# Altium PCB Baseboard-Development.PcbDoc (part 8 of 8)
Units mm, origin at the board's own origin, x right, y up, seen from the top; angles counter-clockwise.
Board outline 120 x 90 mm, 6 copper layers (Top Layer, SIGNAL-1, PWR, SIGNAL-2, GND-2, Bottom Layer), stack 1.705 mm thick; 417 components, 313 nets, 1500 pads, 606 vias.
Unrouted connection lines stored in the file: 357.
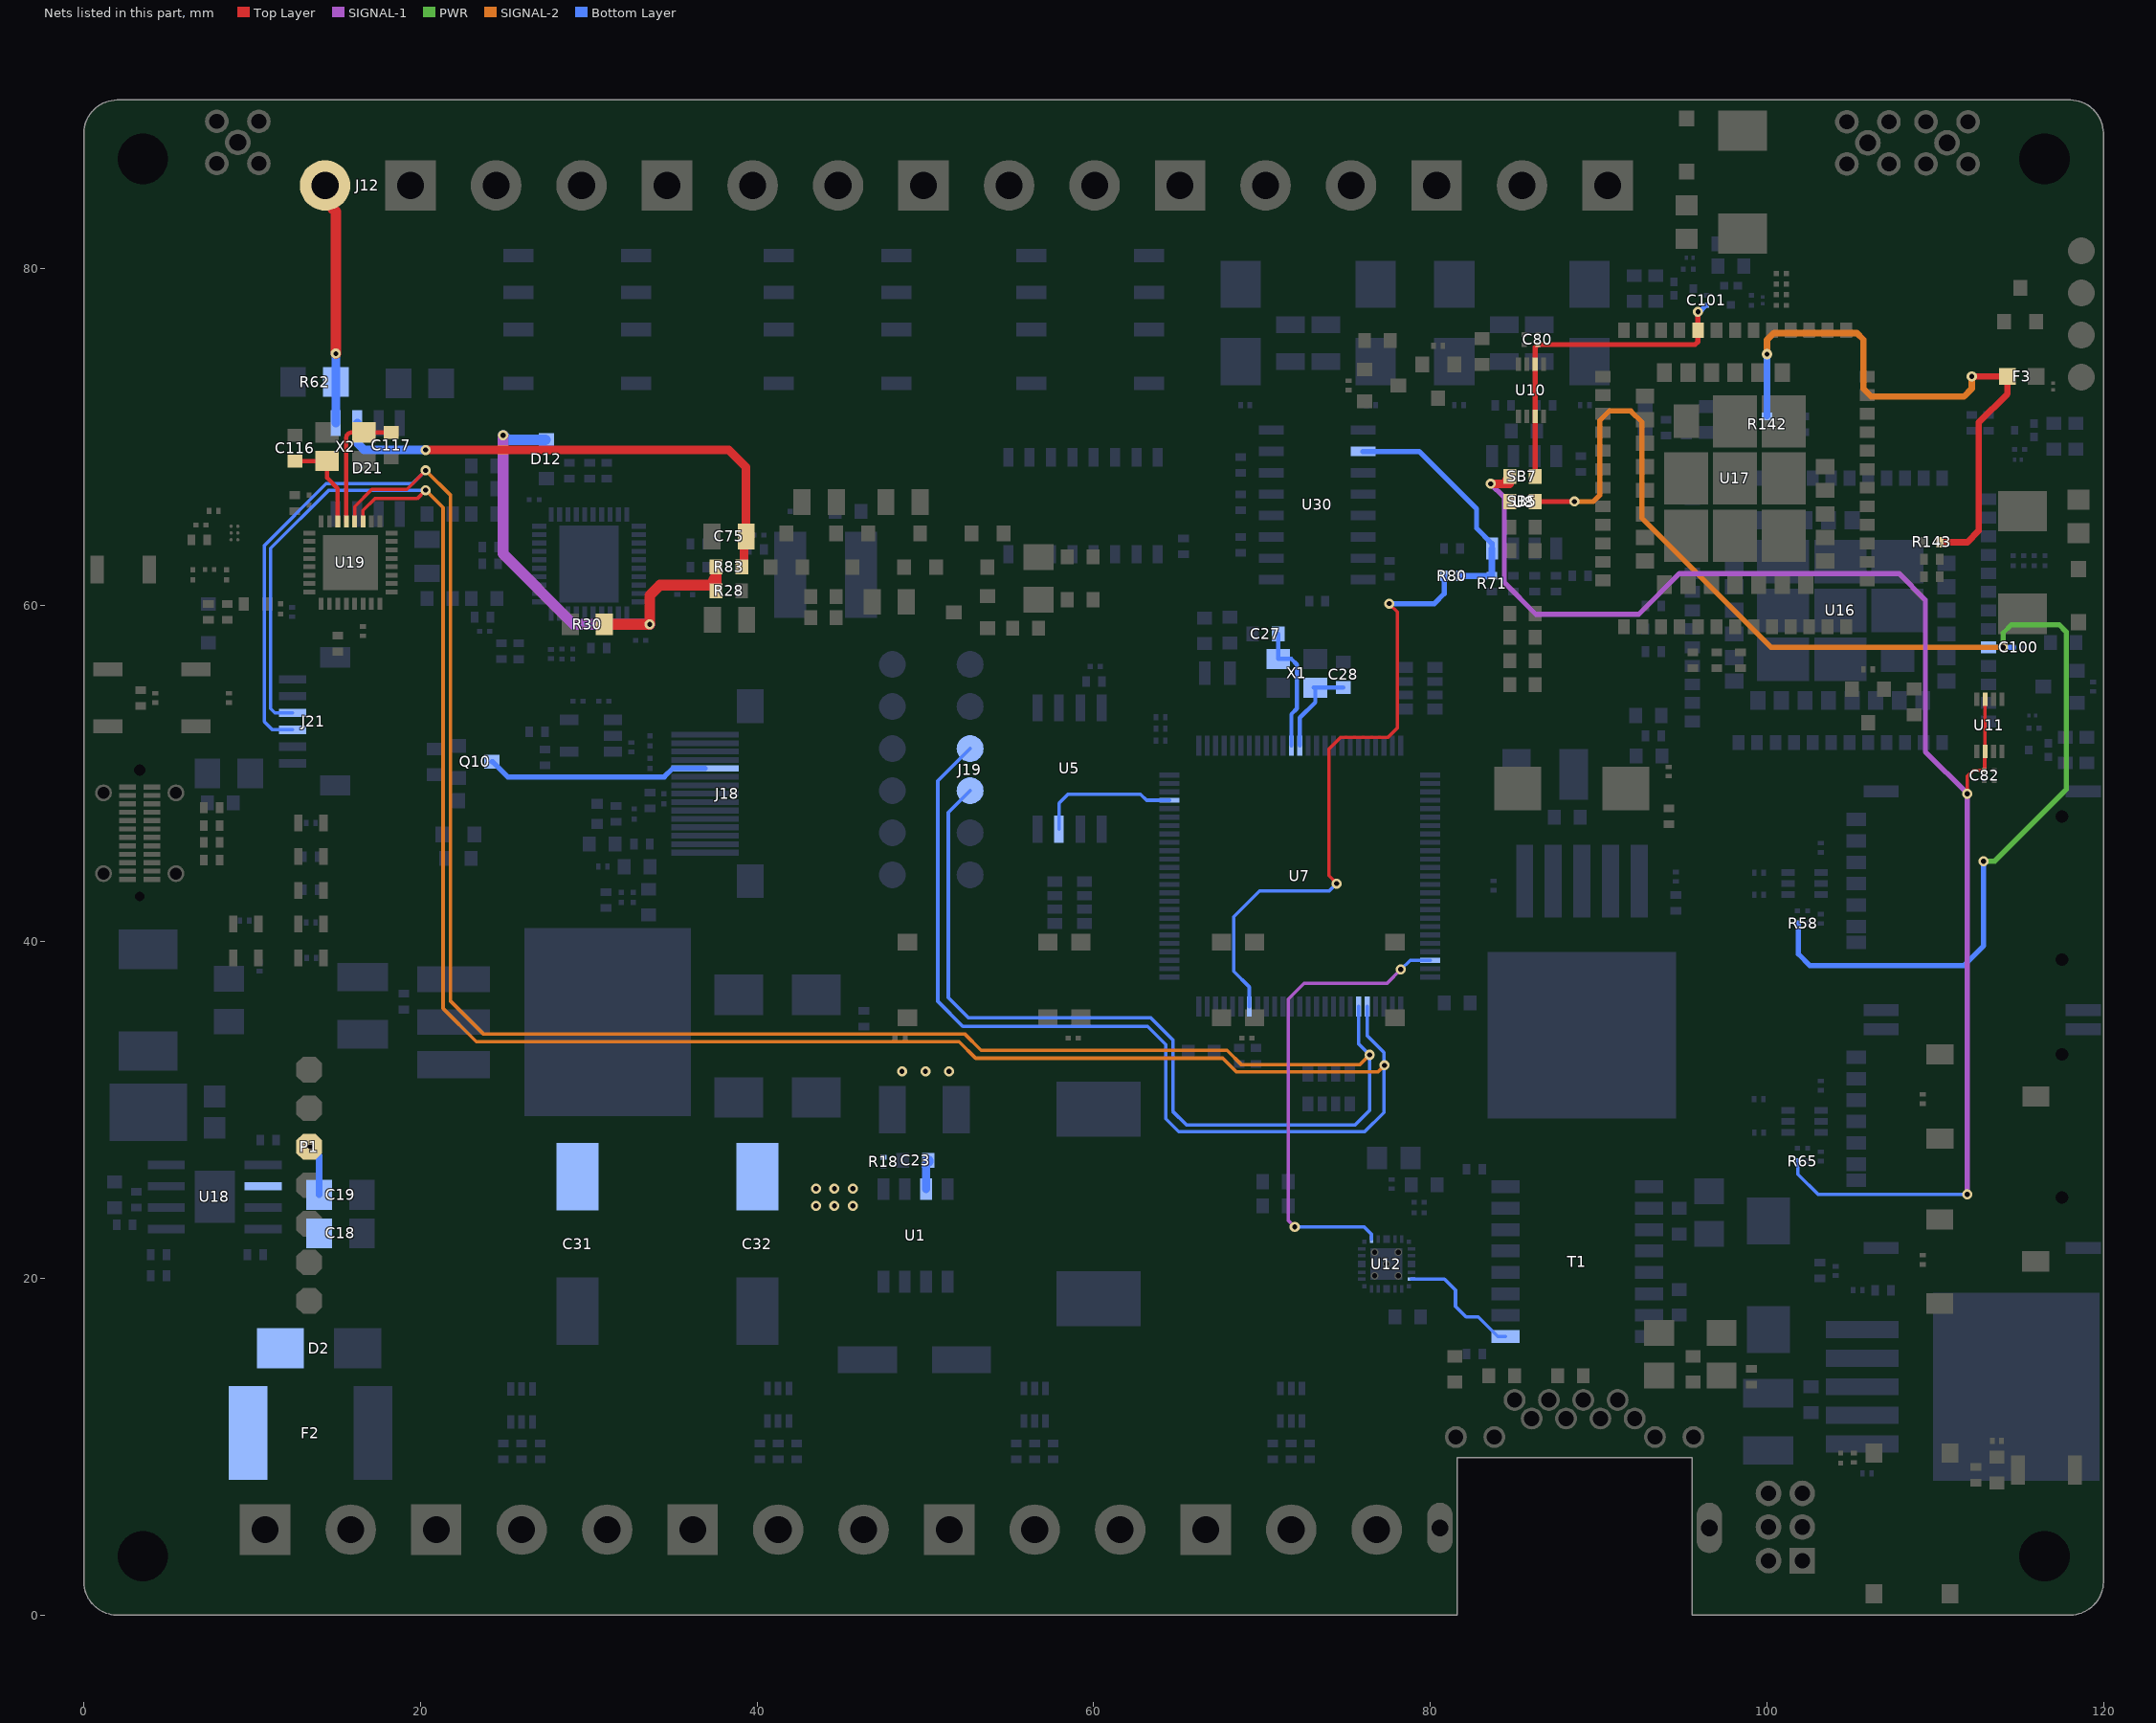
[diagram p9: the nets of this part, all layers, seen from the top]

## Via types
v1: diameter 0.6, hole 0.3, Top Layer to Bottom Layer, tented both sides, 606 vias

## Nets (pads, with @x,y where several pads share a name; then routed paths per layer and width w, separated by ;. In a path a pad name is that pad's centre, name@x,y a point inside that pad or via, vN(x,y) a via of type N, cw(c..) or ccw(c..) an arc to the next point about the centre after c; other vN are vias at no path point) (continued)
TD_P: T1.1 U12.11 | length 7.6
  Bottom Layer w0.203: U12.11@78.875,19.955 80.844,19.955 81.499,19.3 81.499,18.346 82.129,17.715 82.843,17.715 84.011,16.547 T1.1@84.466,16.547
TIP: D21.1 J12.2 R62.1 | length 14.4
  Top Layer w0.635: J12.2@14.335,84.92 14.787,84.467 14.787,83.553 14.975,83.365 v1(14.975,74.93)
  Bottom Layer w0.508: D21.1@14.975,70.805 R62.1@14.975,73.248 v1(14.975,74.93)
TX_EN: U7.48 U12.1 | length 28.1
  SIGNAL-1 w0.203: v1(71.948,23.058) 71.567,23.439 71.567,36.594 72.509,37.536 77.439,37.536 v1(78.252,38.349)
  Bottom Layer w0.203: v1(71.948,23.058) 76.07,23.058 76.5,22.629 U12.1@76.5,22.33 ; v1(78.252,38.349) 78.805,38.901 U7.48@79.999,38.901
TXD/RS485/RS232: R80.1 U7.69 | length 37.6
  Top Layer w0.203: v1(74.442,43.454) 73.978,43.918 73.978,51.444 74.665,52.131 77.477,52.131 78.039,52.694 78.039,59.582 77.57,60.052 v1(77.57,60.081)
  Bottom Layer w0.203: U7.69@69.249,36.151 69.249,37.313 69.243,37.313 68.32,38.236 68.32,41.478 69.852,43.011 73.999,43.011 v1(74.442,43.454)
  Bottom Layer w0.305: v1(77.57,60.081) 80.237,60.082 80.83,60.675 R80.1@80.83,61.729
TXD/RS485/RS232/T: R71.1 R80.2 U8.4 U30.10 | length 14.4
  Bottom Layer w0.305: U30.10@76.009,69.121 79.332,69.121 82.748,65.705 82.748,64.566 83.666,63.648 U8.4@83.666,63.348
  Bottom Layer w0.381: R80.2@81.77,61.729 R71.1@83.666,61.729 U8.4@83.666,63.348
U0RXD: J19.4 J21.4 U7.55 U19.27 | length 170.6
  Top Layer w0.203: U19.27@16.592,64.971 16.592,65.618 17.289,66.315 19.808,66.315 v1(20.315,66.822)
  SIGNAL-2 w0.203: v1(20.315,66.822) 21.345,65.792 21.345,36.039 23.315,34.07 52,34.07 52.991,33.079 67.672,33.079 68.477,32.275 76.897,32.275 v1(77.277,32.655)
  Bottom Layer w0.203: J21.4@12.403,53.586 11.362,53.586 11.101,53.847 11.101,63.367 14.556,66.822 v1(20.315,66.822) ; J19.4@52.662,51.471 50.74,49.55 50.74,36.46 52.223,34.977 63.214,34.977 64.294,33.897 64.294,29.479 65.059,28.714 76.1,28.714 77.249,29.862 77.249,33.416 76.249,34.416 U7.55@76.249,36.151
U0TXD: J19.3 J21.3 U7.56 U19.28 | length 168.6
  Top Layer w0.203: U19.28@16.092,64.971 16.092,65.849 17.114,66.871 19.194,66.871 v1(20.315,67.991)
  SIGNAL-2 w0.203: v1(20.315,67.991) 21.797,66.51 21.797,36.461 23.731,34.527 52.331,34.527 53.307,33.55 67.925,33.55 68.789,32.686 75.805,32.686 v1(76.399,33.28)
  Bottom Layer w0.203: J21.3@12.403,52.586 11.201,52.586 10.72,53.068 10.72,63.526 14.399,67.205 19.529,67.205 v1(20.315,67.991) ; J19.3@52.662,48.971 51.367,47.677 51.367,36.676 52.558,35.485 63.393,35.485 64.703,34.176 64.703,29.927 65.504,29.126 75.542,29.126 76.399,29.983 v1(76.399,33.28) 75.749,33.93 U7.56@75.749,36.151
USB_VBUS: F3.1 R142.1 R143.1 | length 35.7
  Top Layer w0.381: R143.1@110.28,63.731 111.914,63.731 112.58,64.397 112.58,70.827 114.299,72.545 F3.1@114.299,73.582 F3.1@114.299,73.582 112.175,73.581 v1(112.174,73.579)
  SIGNAL-2 w0.381: v1(100.008,74.899) 100.008,75.754 100.4,76.146 105.352,76.146 105.735,75.763 105.735,72.854 106.208,72.381 111.709,72.381 112.174,72.846 v1(112.174,73.579)
  Bottom Layer w0.381: R142.1@100.008,71.211 v1(100.008,74.899)
VBAT: J18.5 Q10.3 | length 13.2
  Bottom Layer w0.305: Q10.3@24.248,50.683 24.298,50.683 25.195,49.785 34.491,49.785 34.999,50.293 J18.5@36.91,50.293
VBAT_REF: C75.2 D21.2 R83.2 | length 30.9
  Top Layer w0.508: v1(20.315,69.21) 38.323,69.21 39.353,68.18 C75.2@39.353,64.069 39.226,63.942 39.226,62.378 R83.2@39.099,62.251
  Bottom Layer w0.508: D21.2@16.245,70.805 16.245,69.622 16.657,69.21 v1(20.315,69.21)
VBATT: D12.1 R28.2 R30.2 R83.1 | length 30.2
  Top Layer w0.635: R30.2@30.931,58.847 v1(33.624,58.847) 33.624,60.57 34.233,61.179 37.189,61.179 37.45,61.439 37.45,61.534 ; R28.2@37.562,60.842 37.568,60.849 37.568,62.245 R83.1@37.575,62.251
  SIGNAL-1 w0.635: v1@24.912,70.072 24.912,63.048 29.114,58.847 v1(33.624,58.847)
  PWR w0.635: v1@24.912,70.072 v1(24.915,70.074)
  Bottom Layer w0.635: v1(24.915,70.074) 25.183,69.807 D12.1@27.434,69.807
VCC: C18.2 C19.2 C23.2 C31.1 C32.1 D2.2 F2.2 P1.1 R18.2 U1.7 U18.2 | length 4.6
  Bottom Layer w0.381: v1(13.452,27.819) 13.982,27.289 C19.2@13.982,24.968
  Bottom Layer w0.508: U1.7@50.046,25.305 C23.2@50.046,26.81
  Bottom Layer w0.635: C23.2@50.173,26.937 C23.2@50.173,27
  other v1: 43.505,24.303 44.597,24.303 45.689,24.303 43.505,25.334 44.597,25.334 45.689,25.334 48.61,32.304 50.007,32.304 51.404,32.304
VDD_EXT: C82.2 R65.2 SB5.2 SB7.2 U11.3 U11.6 | length 89.4
  Top Layer w0.203: v1(111.911,48.793) 111.911,49.822 112.256,50.167 C82.2@112.917,50.167 112.942,50.192 112.942,51.284 U11.6@112.966,51.308 U11.3@112.966,54.408
  Top Layer w0.508: v1(83.586,67.199) SB7.2@84.717,67.199 ; SB7.2@84.526,67.453 84.59,67.453 84.717,67.58 SB7.2@84.717,67.643
  SIGNAL-1 w0.305: v1(83.586,67.199) 84.399,66.386 84.399,61.336 86.288,59.447 92.378,59.447 94.801,61.869 107.843,61.869 109.418,60.294 109.418,51.286 v1(111.911,48.793) v1(111.911,24.988)
  Bottom Layer w0.203: R65.2@101.845,26.966 101.845,26.189 103.046,24.988 v1(111.911,24.988) v1@112.06,24.988
VDD_EXT_1: C100.2 R58.2 SB5.1 U16.40 | length 82.9
  Top Layer w0.305: SB5.1@86.241,66.144 v1(88.565,66.144)
  PWR w0.305: v1(112.872,44.775) 113.518,44.775 117.782,49.04 117.782,58.408 117.363,58.826 114.523,58.826 114.037,58.34 v1(114.037,57.481)
  SIGNAL-2 w0.305: v1(88.565,66.144) 89.69,66.144 90.063,66.517 90.063,70.955 90.629,71.521 91.917,71.521 92.578,70.86 92.578,65.153 100.25,57.481 v1(114.037,57.481)
  Bottom Layer w0.305: R58.2@101.869,41.082 101.869,39.268 102.56,38.577 111.679,38.577 112.872,39.771 v1(112.872,44.775) ; U16.40@113.164,57.481 v1(114.037,57.481) C100.2@114.652,57.481
VDD_EXT_2: C80.2 C101.2 SB7.1 U10.3 U10.6 U17.40 | length 19.9
  Top Layer w0.305: SB7.1@86.241,67.643 86.239,67.645 86.239,71.197 U10.3@86.237,71.199 U10.6@86.237,74.299 86.237,75.317 C80.2@86.387,75.467 95.729,75.467 95.908,75.645 U17.40@95.908,76.312 v1(95.908,77.407)
  Bottom Layer w0.305: v1(95.908,77.407) 95.988,77.407 96.38,77.8 C101.2@96.416,77.8
WP: U5.3 U7.97 | length 8.5
  Bottom Layer w0.203: U5.3@57.938,46.682 57.938,48.227 58.473,48.763 62.78,48.763 63.141,48.401 U7.97@64.499,48.401
XIN: C27.2 U7.12 X1.1 | length 7.7
  Bottom Layer w0.254: C27.2@70.971,58.278 X1.1@70.971,56.791 71.749,56.791 72.071,56.469 72.071,53.841 71.749,53.518 U7.12@71.749,51.651
XOUT: C28.2 U7.13 X1.3 | length 5.6
  Bottom Layer w0.254: U7.13@72.249,51.651 72.249,53.302 73.171,54.224 X1.3@73.171,55.091 ; X1.3@73.071,55.091 C28.2@74.83,55.091
XTALIN: C116.2 U19.30 X2.1 | length 5.8
  Top Layer w0.254: C116.2@12.54,68.552 X2.1@14.451,68.552 14.451,67.56 15.079,66.932 15.079,64.984 U19.30@15.092,64.971
XTALOUT: C117.2 U19.29 X2.3 | length 7.8
  Top Layer w0.254: U19.29@15.592,64.971 15.592,69.912 cw(c15.932,69.912) 15.932,70.252 X2.3@16.651,70.252 C117.2@18.254,70.252
pads on no net: ANT1.2 D21.3 J3.A2 J3.A3 J3.A4 J3.A8 J3.A9 J3.A10 J3.A11 J3.B2 J3.B3 J3.B4 J3.B8 J3.B9 J3.B10 J3.B11 J3.MH1 J3.MH2 J15.C6 J15.MH J16.C6 J16.MH R3.5 R3.6 R3.7 R32.5 R32.6 R32.7 R48.5 R48.6 R48.7 T1.4 T1.5 T1.12 T1.13 U1.1 U1.2 U1.3 U6.4 U6.5 U6.6 U6.7 U6.10 U6.11 U6.12 U6.13 U7.23 U7.26 U7.35 U7.67 U7.88 U9.1 U9.9 U9.10 U9.11 U9.20 U9.32 U9.34 U9.37 U16.3 U16.4 U16.5 U16.6 U16.7 U16.9 U16.10 U16.11 U16.12 U16.20 U16.22 U16.23 U16.28 U16.29 U16.38 U16.43 U16.44 U16.46 U16.47 U16.48 U16.49 U16.50 U16.51 U16.57 U16.58 U16.59 U16.60 U16.61 U16.62 U16.64 U16.65 U16.68 U16.78 U16.79 U16.80 U16.81 U16.84 U16.85 U17.3 U17.4 U17.5 U17.6 U17.7 U17.9 U17.10 U17.11 U17.12 U17.20 U17.22 U17.23 U17.28 U17.29 U17.38 U17.43 U17.44 U17.46 U17.47 U17.48 U17.49 U17.50 U17.51 U17.52 U17.53 U17.54 U17.55 U17.56 U17.57 U17.58 U17.59 U17.60 U17.61 U17.62 U17.64 U17.65 U17.68 U17.78 U17.79 U17.80 U17.81 U17.84 U17.85 U18.3 U19.4 U19.5 U19.8 U19.9 U19.10 U19.12 U19.13 U19.18 U19.19 U19.20 U19.21 U19.22 U19.23 U19.24 U19.25 U19.26 U20.2 U30.11 U30.12 U30.13 U30.14

## Polygon pours and split planes (outlines as drawn)
GND on Bottom Layer "NONET_L-01_P-001" (solid, remove dead copper, pour order 8): 112.983,0.229 112.983,0.003 117.491,0.003 117.805,0.003 ccw(c117.839,3.425) 118.519,0.071 ccw(c117.096,4.273) 118.952,0.244 ccw(c116.45,4.18) 119.352,0.529 ccw(c116.825,3.064) 119.605,0.809 ccw(c116.474,2.918) 119.81,1.15 ccw(c114.491,3.046) 119.981,1.728 ccw(c112.62,2.262) 119.997,2.509 119.997,6.992 119.583,6.992 119.583,82.986 119.997,82.986 119.997,88.035 119.988,88.23 119.9,88.621 119.739,88.975 119.536,89.279 119.264,89.551 118.952,89.76 118.617,89.909 118.232,89.996 117.936,89.997 112.193,89.997 112.193,89.779 112.176,89.761 7.45,89.715 7.45,89.996 7.451,89.997 1.965,89.997 1.616,89.965 ccw(c2.027,87.97) 0.038,88.41 0.004,88.08 0.004,82.986 0.274,82.986 0.274,1.319 ccw(c4.12,3.555) 1.149,0.244 81.059,0.244 81.059,9.36 96.266,9.36 96.266,0.229
GND on Bottom Layer "NONET_L-01_P-001" (solid, pour order 11): -0.001,2.212 0.007,1.773 0.086,1.397 0.236,1.043 0.45,0.724 0.721,0.452 1.039,0.237 1.392,0.085 1.768,0.004 7.007,0 7.01,0.254 1.255,0.452 0.274,1.319 0.395,2.212
VCC on Bottom Layer "VCC_L06_P000" (solid, pour order 0): 13.444,14.148 12.25,14.148 11.869,13.767 11.869,8.32 11.57,8.02 6.331,8.02 6.02,8.331 6.02,19.921 6.723,20.625 12.014,20.625 12.339,20.95 12.339,24.727 9.555,24.727 9.555,26.162 14.755,26.162 14.755,21.8 14.744,21.789 15.096,21.438 19.54,21.438 19.794,21.692 19.794,28.092 19.992,28.29 46.096,28.29 46.096,23.236 25.763,23.236 25.763,18.415 25.103,17.755 13.444,17.755
GSM_PWR_2 on PWR "NONET_L-01_P-001" (solid, pour order 5): 82.799,52.725 84.717,52.725 84.717,50.211 82.799,50.211 82.799,42.913 86.19,39.522 104.597,39.522 105.791,38.329 105.791,26.619 100.477,21.305 100.477,17.343 119.07,17.343 119.146,17.419 119.146,45.06 89.205,45.06 89.205,51.587 105.608,51.587 105.608,78.481 98.344,85.745 92.857,85.745 92.857,77.465 97.607,72.715 97.607,57.145 82.799,57.145
3V3 on PWR "NONET_L-01_P-001" (solid, remove dead copper, pour order 14): 0.274,2.106 ccw(c6.938,5.982) 1.415,0.604 81.059,0.604 81.059,9.36 96.266,9.36 96.266,0.457 118.04,0.457 ccw(c116.892,2.96) 119.583,2.376 119.583,88.82 ccw(c117.756,87.523) 117.804,89.764 1.778,89.713 ccw(c2.626,87.503) 0.274,87.766
5V on PWR "NONET_L-01_P-001" (solid, pour order 2): 82.333,50.414 82.333,48.006 73.203,48.006 73.203,50.978 72.898,51.283 71.095,51.283 70.764,50.952 70.764,50.414 65.603,50.414 65.603,69.677 64.394,70.886 39.624,70.886 39.624,42.926 32.575,35.877 10.637,35.877 10.637,12.161 12.593,10.206 69.159,10.206 71.191,12.238 71.191,36.266 103.581,36.266 105.08,34.767 105.08,26.899 99.69,21.509 99.69,16.733 112.339,16.733 112.339,0.528 95.804,0.528 95.804,27.732 81.305,27.732 81.305,0.604 2.1,0.604 cw(c2.1,2.43) 0.274,2.43 0.274,45.004 30.627,45.004 32.024,46.401 32.024,70.886 22.652,70.886 22.652,74.017 69.87,74.017 69.87,54.224 82.392,54.224 82.392,52.471 84.399,52.471 84.399,50.414
GSM_PWR on PWR "NONET_L-01_P-001" (solid, pour order 3): 89.764,51.125 89.764,45.537 119.349,45.537 119.349,64.384 118.13,65.603 106.243,65.603 106.243,51.125
GND on SIGNAL-1 "NONET_L-01_P-001" (solid, remove dead copper, pour order 16): 0.274,2.106 ccw(c6.938,5.982) 1.415,0.604 81.059,0.604 81.059,9.36 96.266,9.36 96.266,0.457 118.04,0.457 ccw(c116.892,2.96) 119.583,2.376 119.583,88.82 ccw(c117.756,87.523) 117.804,89.764 1.778,89.713 ccw(c2.626,87.503) 0.274,87.766
+12V on SIGNAL-1 "NONET_L-01_P-001" (solid, pour order 7): 48.28,17.216 48.28,15.971 48.839,15.413 51.709,15.413 52.395,16.098 52.395,21.178 51.811,21.763 29.281,21.763 28.372,22.672 28.372,50.546 28.824,50.998 42.21,50.998 42.87,51.658 42.87,59.558 42.26,60.167 37.434,60.167 37.028,59.761 37.028,56.027 36.418,55.418 24.582,55.418 23.871,54.706 23.871,18.969 25.217,17.622 47.874,17.622
VCC on SIGNAL-1 "NONET_L-01_P-001" (solid, pour order 6): 37.587,22.245 37.587,31.821 47.594,31.821 47.594,33.955 51.912,33.955 51.912,24.836 47.95,24.836 47.95,22.245
3V3 on Top Layer "NONET_L-01_P-001" (solid, pour order 17): 13.766,53.264 13.766,49.176 13.767,49.174 16.561,49.174 16.561,37.516 42.85,37.516 42.85,41.91 27.737,41.91 27.711,41.885 27.711,53.264
GND on Top Layer "NONET_L-01_P-001" (solid, pour order 13): -0.001,2.212 0.007,1.773 0.086,1.397 0.236,1.043 0.45,0.724 0.721,0.452 1.039,0.237 1.392,0.085 1.768,0.004 7.007,0 7.01,0.254 1.255,0.452 0.274,1.319 0.395,2.212
GND on Top Layer "NONET_L-01_P-001" (solid, remove dead copper, pour order 12): 112.983,0.229 112.983,0.003 117.491,0.003 117.805,0.003 ccw(c117.839,3.425) 118.519,0.071 ccw(c117.096,4.273) 118.952,0.244 ccw(c116.45,4.18) 119.352,0.529 ccw(c116.825,3.064) 119.605,0.809 ccw(c116.474,2.918) 119.81,1.15 ccw(c114.491,3.046) 119.981,1.728 ccw(c112.62,2.262) 119.997,2.509 119.997,6.992 119.583,6.992 119.583,82.986 119.997,82.986 119.997,88.035 119.988,88.23 119.9,88.621 119.739,88.975 119.536,89.279 119.264,89.551 118.952,89.76 118.617,89.909 118.232,89.996 117.936,89.997 112.193,89.997 112.193,89.779 112.176,89.761 7.45,89.715 7.45,89.996 7.451,89.997 1.965,89.997 1.616,89.965 ccw(c2.027,87.97) 0.038,88.41 0.004,88.08 0.004,82.986 0.274,82.986 0.274,1.319 ccw(c4.12,3.555) 1.149,0.244 81.059,0.244 81.059,9.36 96.266,9.36 96.266,0.229
GND on SIGNAL-2 "NONET_L-01_P-001" (solid, remove dead copper, pour order 9): 0.274,2.106 ccw(c6.938,5.982) 1.415,0.604 81.059,0.604 81.059,9.576 96.098,9.576 96.098,0.457 118.04,0.457 ccw(c116.892,2.96) 119.583,2.376 119.583,88.82 ccw(c117.756,87.523) 117.804,89.764 1.778,89.713 ccw(c2.626,87.503) 0.274,87.766
GND on GND-2 "NONET_L-01_P-001" (solid, remove dead copper, pour order 15): 0.274,2.106 ccw(c6.938,5.982) 1.415,0.604 81.059,0.604 81.059,9.36 96.266,9.36 96.266,0.457 118.04,0.457 ccw(c116.892,2.96) 119.583,2.376 119.583,88.82 ccw(c117.756,87.523) 117.804,89.764 1.778,89.713 ccw(c2.626,87.503) 0.274,87.766

## Other copper
Top Layer:
  rectangle net GND: 56.706,39.83 59.819,40.482
  rectangle net GND: 8.56,2.921 12.881,7.188
  rectangle net NetF2_1: 13.64,2.921 17.961,7.188
  rectangle net 5V: 14.017,36.576 14.827,38.176
  rectangle net 5V: 0.686,40.792 6.299,41.758
  rectangle net GND: 76.7,20.155 78.1,21.555
  rectangle net NC_1: 26.199,75.658 28.981,77.064
  rectangle net 3V3: 18.239,59.272 18.835,60.911
  rectangle net NetC57_1: 44.188,65.36 45.318,67.731
  rectangle net GND: 0.003,1.965 0.362,7.006
  rectangle net +12V: 40.203,57.323 42.413,58.11
  rectangle net GSM_PWR: 90.23,47.7 94.494,49.982
  rectangle net GSM_PWR: 90.23,46.127 93.02,50.383
  rectangle net SIM_VCC: 84.221,62.682 85.098,65.069
  rectangle net VDD_EXT: 84.221,65.7 85.098,68.088
  rectangle net NetC95_2: 113.744,65.393 119.179,66.857
  rectangle net NetC95_2: 113.744,63.324 116.644,66.771
  rectangle net GND: 7.851,64.163 8.834,64.384
  rectangle net GND: 7.851,64.163 8.322,64.943
  rectangle net 3V3: 7.104,63.556 7.582,65.77
  region net GND: 113.744,59.727 113.744,58.247 119.119,58.247 119.119,59.727
  rectangle net GSM_PWR: 117.164,61.658 119.256,64.857
  rectangle net NetC126_1: 10.617,59.916 11.838,60.466
  region net VBATT: 38.028,60.322 38.028,62.747 36.872,62.747 36.872,60.322
  region net NetC59_2: 50.299,63.657 50.299,66.883 49.143,66.883 49.143,63.657
  region net NetC59_2: 55.19,64.813 49.277,64.813 49.277,63.657 55.19,63.657
  rectangle net NetC57_1: 44.188,65.36 48.163,66.897
  region net NetC57_2: 41.337,66.859 41.337,63.836 43.184,63.836 43.184,66.859
  region net NetC57_2: 47.158,64.813 41.337,64.813 41.337,63.657 47.158,63.657
  region net VBAT_REF: 39.861,61.807 39.861,64.831 38.705,64.831 38.705,61.807
  region net NetC55_2: 43.575,58.819 43.575,62.719 40.387,62.719 40.387,58.819
  rectangle net NetC55_2: 40.387,61.791 43.565,62.711
  rectangle net NetC55_2: 38.705,58.36 43.565,61.387
  rectangle net NetC55_1: 47.147,61.737 51.047,62.711
  rectangle net GND: 94.945,70.912 102.308,72.862
  region net GND: 100.708,79.842 99.958,79.842 99.958,75.862 100.708,75.862
  rectangle net NetC90_2: 101.002,75.839 102.865,76.779
  rectangle net GND: 93.908,62.562 102.308,71.432
  rectangle net NetC90_2: 101.008,75.839 102.865,82.47
  region net NetC90_2: 94.572,82.47 94.572,80.868 102.865,80.868 102.865,82.47
  rectangle net GSM_PWR_2: 93.467,83.144 95.892,86.22
  rectangle net GND: 93.467,86.968 100.005,89.37
  rectangle net NetC55_1: 44.318,58.77 47.347,62.711
  rectangle net NetC108_2: 7.62,61.976 8.636,62.233
  rectangle net 3V3: 13.952,64.621 14.732,65.321
  rectangle net 3V3: 6.299,59.666 9.817,60.466
  rectangle net NetC126_1: 12.94,63.131 13.837,63.911
  region net NetD14_2: 115.488,74.075 115.488,73.075 119.24,73.075 119.24,74.075
  rectangle net NetQ2_1: 80.607,73.828 80.877,75.582
  rectangle net GND: 80.057,73.828 80.327,75.582
  rectangle net GND: 79.107,73.828 80.327,74.748
  region net GND: 76.56,72.629 76.56,72.899 74.934,72.899 74.934,72.629
  region net NetQ4_1: 76.56,73.179 76.56,76.151 75.64,76.151 75.64,73.179
  region net NetQ4_1: 76.56,73.179 76.56,73.449 74.934,73.449 74.934,73.179
  region net GND: 76.56,71.679 76.56,72.899 75.64,72.899 75.64,71.679
  rectangle net NetQ2_1: 80.607,73.828 83.528,74.748
  rectangle net NetQ3_1: 106.153,54.544 109.201,55.379
  rectangle net NetQ3_1: 106.153,54.544 107.373,56.36
  pour cut-out: 21.133,79.607 21.133,87.351 68.021,87.351 68.021,72.72 21.133,72.72
  pour cut-out: 5.995,65.126 0,65.126 0,59.126 5.995,59.126
  pour cut-out: 81.829,11.418 81.829,27.535 95.448,27.535 95.448,11.418
SIGNAL-1:
  pour cut-out: 21.133,79.607 21.133,87.351 68.021,87.351 68.021,74.148 21.133,74.148
  pour cut-out: 5.995,65.126 0,65.126 0,59.126 5.995,59.126
  pour cut-out: 81.829,11.418 81.829,27.535 95.448,27.535 95.448,11.418
PWR:
  pour cut-out: 106.483,65.784 106.483,65.603 105.608,65.603 105.608,65.784
  pour cut-out: 21.133,79.607 21.133,87.351 67.463,87.351 67.463,74.803 21.133,74.803
  pour cut-out: 5.995,65.126 0,65.126 0,59.126 5.995,59.126
  pour cut-out: 81.829,11.418 81.829,27.535 95.448,27.535 95.448,11.418
SIGNAL-2:
  rectangle net GND: 76.483,20.009 78.323,21.768
  pour cut-out: 21.133,79.607 21.133,87.351 68.021,87.351 68.021,74.148 21.133,74.148
  pour cut-out: 5.995,65.126 0,65.126 0,59.126 5.995,59.126
  pour cut-out: 81.829,11.418 81.829,27.535 95.448,27.535 95.448,11.418
GND-2:
  rectangle net GND: 75.924,19.477 78.818,22.221
  pour cut-out: 81.829,11.418 81.829,27.535 95.448,27.535 95.448,11.418
  pour cut-out: 21.133,79.607 21.133,87.351 68.021,87.351 68.021,74.148 21.133,74.148
  pour cut-out: 5.995,65.126 0,65.126 0,59.126 5.995,59.126
Bottom Layer:
  rectangle net GND: 28.192,55.657 28.931,56.952
  rectangle net GND: 28.192,56.645 29.2,56.952
  rectangle net 5V: 31.048,54.502 33.11,55.324
  rectangle net 3V3: 14.36,51.965 20.138,53.047
  rectangle net GND: 29.512,54.14 30.748,54.44
  rectangle net +3V8: 28.291,52.88 29.212,54.44
  rectangle net NetQ10_1: 21.768,47.904 22.708,50.331
  region net 5V: 31.048,55.324 31.048,52.88 31.991,52.88 31.991,55.324
  rectangle net 3V3: 57.238,40.764 58.138,43.894
  rectangle net 3V3: 76.099,51.051 76.899,53.189
  rectangle net 3V3: 6.299,59.648 7.854,60.448
  rectangle net 5V: 14.112,36.436 15.185,38.747
  rectangle net NetC57_1: 44.328,66.87 48.039,67.728
  rectangle net NetC57_1: 45.79,63.094 48.031,67.728
  rectangle net GND: 0.003,1.965 0.362,7.006
  rectangle net NetC57_1: 45.028,59.041 48.039,64.372
  rectangle net 3V3: 25.547,47.828 31.936,49.015
  rectangle net 3V3: 25.649,45.004 30.411,46.246
  rectangle net 3V3: 25.547,39.314 28.464,49.015
  rectangle net 3V3: 25.547,29.642 36.076,40.818
  rectangle net 3V3: 33.574,34.005 42.995,40.818
  rectangle net 3V3: 30.154,47.828 31.936,49.015
  rectangle net 3V3: 26.17,35.644 42.995,40.818
  rectangle net +12V: 44.851,16.53 54.605,18.588
  rectangle net +12V: 44.851,16.53 48.128,21.534
  region net GSM_PWR_2: 108.58,14.631 108.58,16.019 98.584,16.019 98.584,14.631
  rectangle net 3V3: 25.547,35.644 46.705,40.265
  rectangle net 5V: 82.388,50.259 86.596,51.582
  rectangle net +12V: 50.41,14.364 54.808,17.597
  rectangle net +12V: 53.91,14.364 62.782,20.423
  rectangle net GND: 48.268,24.655 49.126,31.418
  rectangle net NetD7_1: 50.966,24.655 54.833,31.685
  rectangle net VCC: 47.975,31.923 52.181,33.503
  rectangle net VCC: 49.508,24.655 50.554,32.862
  rectangle net NetR18_1: 46.604,24.655 47.856,26.779
  rectangle net 3V3: 72.411,29.917 75.541,31.183
  rectangle net 3V3: 76.236,25.744 77.881,27.807
  rectangle net 3V3: 76.099,51.051 76.899,52.251
  rectangle net 3V3: 79.381,37.163 80.599,38.051
  rectangle net 3V3: 65.898,35.542 66.399,36.751
  rectangle net GSM_PWR: 90.197,46.135 92.929,49.933
  rectangle net GSM_PWR: 90.019,40.952 91.348,49.933
  rectangle net GSM_PWR: 90.197,41.426 91.217,45.746
  rectangle net 5V: 0.274,36.876 6.751,41.778
  rectangle net 5V: 14.112,36.678 24.138,38.747
  rectangle net 5V: 63.514,62.377 67.652,63.342
  rectangle net 5V: 39.079,72.457 43.601,73.864
  rectangle net 5V: 23.605,72.457 28.126,73.864
  rectangle net 5V: 54.085,72.457 58.606,73.864
  rectangle net 3V3: 79.834,53.488 80.734,56.618
  rectangle net 5V: 2.074,36.876 9.507,40.728
  rectangle net GND: 20.888,44.514 21.867,46.831
  rectangle net OLED_ON/OFF: 22.629,44.514 23.608,46.831
  region net NetQ10_1: 22.708,49.323 22.708,50.331 20.39,50.331 20.39,49.323
  region net +3V8: 22.708,51.064 22.708,52.043 20.39,52.043 20.39,51.064
  rectangle net GSM_PWR: 117.04,62.161 118.069,64.431
  rectangle net NetC95_2: 112.714,62.631 113.614,64.431
  rectangle net NetC95_2: 112.714,62.784 116.668,64.431
  rectangle net NC_3: 54.085,75.657 58.606,77.064
  rectangle net NO_3: 55.793,80.057 57.552,81.464
  rectangle net NO_1: 24.752,80.023 27.072,81.77
  rectangle net NC_1: 24.915,75.657 29.06,77.064
  rectangle net +12V: 40.178,57.271 42.995,64.346
  rectangle net NetD7_1: 51.031,28.291 62.782,31.685
  rectangle net VCC: 40.37,27.059 47.691,28.291
  region net NetC57_1: 51.101,60.126 45.221,60.126 45.221,59.041 51.101,59.041
  region net 3V3: 29.13,34.082 29.13,36.114 19.82,36.114 19.82,34.082
  region net GSM_PWR_2: 104.269,18.359 104.269,20.302 98.584,20.302 98.584,18.359
  rectangle net GSM_PWR_2: 98.584,14.754 102.827,19.298
  region net GND: 107.803,63.081 107.803,56.981 109.353,56.981 109.353,63.081
  region net GND: 108.064,63.881 99.414,63.881 99.414,55.481 108.064,55.481
  rectangle net NetQ7_1: 96.71,78.75 97.716,81.9
  rectangle net GND: 7.92,2.281 12.542,6.853
  rectangle net NetC8_2: 4.922,47.747 8.148,51.074
  rectangle net 3V3: 60.188,53.087 60.768,56.497
  rectangle net 3V3: 63.493,51.763 63.903,53.533
  region net +12V: 42.921,64.372 40.178,64.372 40.178,62.885 42.921,62.885
  rectangle net NO_2: 40.553,80.057 42.312,81.464
  rectangle net GND: 15.946,64.612 17.826,66.187
  rectangle net NC_2: 39.079,75.657 43.601,77.064
  rectangle net 3V3: 82.36,60.447 87.793,61.087
  rectangle net 3V3: 75.278,61.221 79.644,61.997
  rectangle net NetC49_2: 78.816,23.611 79.258,27.522
  rectangle net NetC49_2: 78.236,24.904 79.258,27.807
  rectangle net NetC17_1: 1.422,26.496 6.124,35.258
  rectangle net GND: 3.805,25.226 8.98,25.726
  rectangle net GND: 87.206,48.286 89.416,51.435
  rectangle net 5V: 84.044,46.198 87.959,47.838
  rectangle net GND: 87.675,48.435 89.416,51.435
  rectangle net 5V: 84.044,46.198 86.596,51.582
  rectangle net 5V: 86.696,41.424 87.959,47.838
  rectangle net ADJ: 94.278,42.519 94.913,43.721
  rectangle net GND: 88.396,40.869 89.517,51.435
  rectangle net GND: 75.278,62.377 77.887,63.05
  rectangle net NetF2_1: 13.444,3.048 18.346,13.62
  region net GND: 107.831,12.863 107.831,14.216 98.584,14.216 98.584,12.863
  region net GND: 100.822,12.333 100.822,14.074 98.584,14.074 98.584,12.333
  region net 5V: 109.062,11.087 109.062,12.421 101.989,12.421 101.989,11.087
  region net 5V: 102.978,8.933 102.978,12.421 101.989,12.421 101.989,8.933
  region net 5V: 102.978,8.933 102.978,11.918 98.459,11.918 98.459,8.933
  region net ADJ2: 106.663,18.981 106.663,19.616 105.536,19.616 105.536,18.981
  rectangle net RE/DE/RS485/T: 84.586,61.501 86.556,63.998
  pour cut-out: 21.133,79.607 21.133,87.351 68.021,87.351 68.021,74.148 21.133,74.148
  pour cut-out: 5.995,65.126 0,65.126 0,59.126 5.995,59.126
  pour cut-out: 107.129,41.715 107.129,40.343 110.457,40.343 110.457,41.715
  pour cut-out: 107.129,44.255 107.129,42.883 110.457,42.883 110.457,44.255
  pour cut-out: 107.129,46.795 107.129,45.423 110.457,45.423 110.457,46.795
  pour cut-out: 114.749,46.795 114.749,45.423 118.076,45.423 118.076,46.795
  pour cut-out: 114.749,44.255 114.749,42.883 118.076,42.883 118.076,44.255
  pour cut-out: 114.749,41.715 114.749,40.343 118.076,40.343 118.076,41.715
  pour cut-out: 114.749,32.669 114.749,31.297 118.076,31.297 118.076,32.669
  pour cut-out: 114.749,30.129 114.749,28.757 118.076,28.757 118.076,30.129
  pour cut-out: 114.749,27.589 114.749,26.217 118.076,26.217 118.076,27.589
  pour cut-out: 107.129,27.589 107.129,26.217 110.456,26.217 110.456,27.589
  pour cut-out: 107.129,32.669 107.129,31.297 110.457,31.297 110.457,32.669
  pour cut-out: 107.129,30.129 107.129,28.757 110.456,28.757 110.456,30.129
  pour cut-out: 81.829,11.418 81.829,27.535 95.448,27.535 95.448,11.418

## Silkscreen, mask and mechanical layers (free items; w line width, h text height)
Top Overlay:
  drawing of 98 lines, arcs and shapes, not listed
  text "WIFI" at 10.173,79.879 h2.54 r90
  text "LTE1" at 111.722,79.694 h2.54 r90
  text "LTE2" at 107.023,79.566 h2.54 r90
  text "B" at 86.026,78.573 h1.14 r90
  text "A" at 91.106,78.573 h1.14 r90
  text "NO" at 25.066,77.431 h1.14 r90
  text "NC" at 35.226,77.431 h1.14 r90
  text "NO" at 40.306,77.431 h1.14 r90
  text "NC" at 50.466,77.431 h1.14 r90
  text "NO" at 55.546,77.431 h1.14 r90
  text "NC" at 65.706,77.431 h1.14 r90
  text "TX" at 70.786,77.431 h1.14 r90
  text "RX" at 75.866,77.431 h1.14 r90
  text "COM" at 30.146,76.288 h1.14 r90
  text "COM" at 45.386,76.288 h1.14 r90
  text "COM" at 60.626,76.288 h1.14 r90
  text "GND" at 80.946,76.288 h1.14 r90
  text "DIAL" at 15.048,73.634 h1.91
  text "DATA" at 68.591,73.279 h1.91
  text "RELAY 1" at 22.377,73.254 h1.91
  text "RELAY 2" at 37.617,73.254 h1.91
  text "RELAY 3" at 52.857,73.254 h1.91
  text "OUTPUTS" at 22.377,71.069 h1.91
  text "STATUS" at 12.314,48.372 h1.91
  text "SYSTEM" at 15.877,46.533 h1.02
  text "CONFIG MODE" at 15.877,44.552 h1.02
  text "WIFI" at 15.877,42.545 h1.02
  text "LTE 1" at 15.877,40.564 h1.02
  text "LTE 2" at 15.877,38.532 h1.02
  text "DEVELOPMENT" at 4.877,17.308 h1.27 r90
  text "POWER" at 8.123,15.088 h1.91
  text "DIGITAL INPUTS" at 18.385,15.082 h1.91
  text "VERSION" at 1.353,11.722 h0.89
  text "DC" at 13.889,11.672 h1.14 r90
  text "GND" at 16.302,11.439 h0.89 r90
  text "01" at 21.509,10.601 h1.14 r90
  text "02" at 26.589,10.601 h1.14 r90
  text "03" at 31.669,10.601 h1.14 r90
  text "03" at 36.749,10.601 h1.14 r90
  text "03" at 41.829,10.601 h1.14 r90
  text "03" at 46.909,10.601 h1.14 r90
  text "03" at 51.989,10.601 h1.14 r90
  text "03" at 57.069,10.601 h1.14 r90
  text "09" at 62.149,10.601 h1.14 r90
  text "10" at 67.229,10.601 h1.14 r90
  text "11" at 72.309,10.601 h1.14 r90
  text "12" at 77.389,10.601 h1.14 r90
  text "9-30V" at 11.222,10.55 h0.89 r90
  text "SYSTEM / RESET" at 118.003,10.388 h1.27 r90
  text "PIN /      LEARN" at 110.221,9.435 h1.52 r90
  text "1" at 4.051,8.877 h1.14
Top Solder:
  region: 0.003,6.999 0.003,1.963 ccw(c2.003,2.007) 1.968,0.007 1.965,0.003 7,0 7,7
  region: 119.997,6.998 119.997,1.963 cw(c117.997,2.006) 118.032,0.007 118.035,0.003 113,0 113,7
  region: 119.997,83.002 119.997,88.037 ccw(c117.997,87.993) 118.032,89.993 118.035,89.997 113,90 113,83
  region: 0.003,83.002 0.003,88.037 cw(c2.003,87.993) 1.968,89.993 1.965,89.997 7,90 7,83
Bottom Solder:
  region: 119.997,83.002 119.997,88.037 ccw(c117.997,87.993) 118.032,89.993 118.035,89.997 113,90 113,83
  region: 119.997,6.998 119.997,1.963 cw(c117.997,2.006) 118.032,0.007 118.035,0.003 113,0 113,7
  region: 0.003,6.999 0.003,1.963 ccw(c2.003,2.007) 1.968,0.007 1.965,0.003 7,0 7,7
  region: 0.003,83.002 0.003,88.037 cw(c2.003,87.993) 1.968,89.993 1.965,89.997 7,90 7,83
Dimensions:
  lines w0.254: -0.005,59.126 5.995,59.126 5.995,65.126 -0.005,65.126 -0.005,59.126 ; 107.129,26.217 110.456,26.217 110.456,27.589 107.129,27.589 107.129,26.217 ; 107.129,28.757 110.456,28.757 110.456,30.129 107.129,30.129 107.129,28.757 ; 107.129,31.297 110.457,31.297 110.457,32.669 107.129,32.669 107.129,31.297 ; 107.129,40.343 110.457,40.343 110.457,41.715 107.129,41.715 107.129,40.343 ; 107.129,42.883 110.457,42.883 110.457,44.255 107.129,44.255 107.129,42.883 ; 107.129,45.423 110.457,45.423 110.457,46.795 107.129,46.795 107.129,45.423 ; 114.749,26.217 118.076,26.217 118.076,27.589 114.749,27.589 114.749,26.217 ; 114.749,28.757 118.076,28.757 118.076,30.129 114.749,30.129 114.749,28.757 ; 114.749,31.297 118.076,31.297 118.076,32.669 114.749,32.669 114.749,31.297 ; 114.749,40.343 118.076,40.343 118.076,41.715 114.749,41.715 114.749,40.343 ; 114.749,42.883 118.076,42.883 118.076,44.255 114.749,44.255 114.749,42.883 ; 114.749,45.423 118.076,45.423 118.076,46.795 114.749,46.795 114.749,45.423
Board Outline:
  lines w0.127: 21.524,86.614 21.524,83.567 ccw(c21.819,83.567) 21.819,83.272 22.166,83.272 ccw(c22.166,83.567) 22.461,83.567 22.461,86.639 ; 21.524,86.631 cw(c21.819,86.631) 21.819,86.926 22.166,86.926 cw(c22.166,86.631) 22.461,86.631 ; 26.604,86.614 26.604,83.567 ccw(c26.899,83.567) 26.899,83.272 27.246,83.272 ccw(c27.246,83.567) 27.541,83.567 27.541,86.639 ; 26.604,86.631 cw(c26.899,86.631) 26.899,86.926 27.246,86.926 cw(c27.246,86.631) 27.541,86.631 ; 31.684,86.614 31.684,83.567 ccw(c31.979,83.567) 31.979,83.272 32.326,83.272 ccw(c32.326,83.567) 32.621,83.567 32.621,86.639 ; 31.684,86.631 cw(c31.979,86.631) 31.979,86.926 32.326,86.926 cw(c32.326,86.631) 32.621,86.631 ; 36.764,86.614 36.764,83.567 ccw(c37.059,83.567) 37.059,83.272 37.406,83.272 ccw(c37.406,83.567) 37.701,83.567 37.701,86.639 ; 36.764,86.631 cw(c37.059,86.631) 37.059,86.926 37.406,86.926 cw(c37.406,86.631) 37.701,86.631 ; 41.844,86.614 41.844,83.567 ccw(c42.139,83.567) 42.139,83.272 42.486,83.272 ccw(c42.486,83.567) 42.781,83.567 42.781,86.639 ; 41.844,86.631 cw(c42.139,86.631) 42.139,86.926 42.486,86.926 cw(c42.486,86.631) 42.781,86.631 ; 46.924,86.614 46.924,83.567 ccw(c47.219,83.567) 47.219,83.272 47.566,83.272 ccw(c47.566,83.567) 47.861,83.567 47.861,86.639 ; 46.924,86.631 cw(c47.219,86.631) 47.219,86.926 47.566,86.926 cw(c47.566,86.631) 47.861,86.631 ; 52.004,86.614 52.004,83.567 ccw(c52.299,83.567) 52.299,83.272 52.646,83.272 ccw(c52.646,83.567) 52.941,83.567 52.941,86.639 ; 52.004,86.631 cw(c52.299,86.631) 52.299,86.926 52.646,86.926 cw(c52.646,86.631) 52.941,86.631 ; 57.084,86.614 57.084,83.567 ccw(c57.379,83.567) 57.379,83.272 57.726,83.272 ccw(c57.726,83.567) 58.021,83.567 58.021,86.639 ; 57.084,86.631 cw(c57.379,86.631) 57.379,86.926 57.726,86.926 cw(c57.726,86.631) 58.021,86.631 ; 62.164,86.614 62.164,83.567 ccw(c62.459,83.567) 62.459,83.272 62.806,83.272 ccw(c62.806,83.567) 63.101,83.567 63.101,86.639 ; 62.164,86.631 cw(c62.459,86.631) 62.459,86.926 62.806,86.926 cw(c62.806,86.631) 63.101,86.631 ; 67.168,86.631 cw(c67.463,86.631) 67.463,86.926 67.81,86.926 cw(c67.81,86.631) 68.106,86.631 ; 67.168,86.639 67.168,83.567 ccw(c67.463,83.567) 67.463,83.272 67.81,83.272 ccw(c67.81,83.567) 68.106,83.567 68.106,86.614 ; 43.442,42.452 ccw(c43.873,42.452) 43.873,42.02 45.905,42.02 ccw(c45.905,42.452) 46.337,42.452 46.337,54.761 ccw(c45.905,54.761) 45.905,55.192 43.873,55.192 ccw(c43.873,54.761) 43.442,54.761 43.442,42.452
  lines w0.254: 0,62.835 0,63.221 ; 0,88.04 cw(c2,87.997) 1.965,89.997 118.037,89.997 ; 0.003,88.037 0.003,1.965 ccw(c2.003,2) 1.96,0 ; 118.04,90 cw(c117.997,88) 119.997,88.035 119.997,1.963 ; 120,1.96 cw(c118.001,2.003) 118.035,0.003 95.565,0.003 95.565,9.36 81.598,9.36 81.598,0 1.96,0 ; 1.96,0 1.96,0
Fabrication:
  drawing of 451 lines, arcs and shapes, not listed
  text "Layer" at 139.129,86.792 h1.52
  text "Name" at 149.54,86.792 h1.52
  text "Material" at 173.156,86.792 h1.52
  text "Thickness" at 194.994,86.792 h1.52
  text "Constant" at 211.5,86.792 h1.52
  text "Board Layer Stack" at 225.974,86.792 h1.52
  text "Top Overlay" at 149.54,83.744 h1.52
  text "Top Solder" at 149.54,80.696 h1.52
  text "Solder Resist" at 173.156,80.696 h1.52
  text "0.010mm" at 194.994,80.696 h1.52
  text "3.5" at 211.5,80.696 h1.52
  text "1" at 139.129,77.648 h1.52
  text "Top Layer" at 149.54,77.648 h1.52
  text "0.035mm" at 194.994,77.648 h1.52
  text "Dielectric 1" at 149.54,74.6 h1.52
  text "PP-006" at 173.156,74.6 h1.52
  text "0.203mm" at 194.994,74.6 h1.52
  text "4.4" at 211.5,74.6 h1.52
  text "2" at 139.129,71.552 h1.52
  text "SIGNAL-1" at 149.54,71.552 h1.52
  text "CF-004" at 173.156,71.552 h1.52
  text "0.030mm" at 194.994,71.552 h1.52
  text "Dielectric 2" at 149.54,68.504 h1.52
  text "PP-006" at 173.156,68.504 h1.52
  text "0.250mm" at 194.994,68.504 h1.52
  text "4.6" at 211.5,68.504 h1.52
  text "3" at 139.129,65.456 h1.52
  text "PWR" at 149.54,65.456 h1.52
  text "CF-004" at 173.156,65.456 h1.52
  text "0.030mm" at 194.994,65.456 h1.52
  text "Dielectric 3" at 149.54,62.408 h1.52
  text "PP-006" at 173.156,62.408 h1.52
  text "0.203mm" at 194.994,62.408 h1.52
  text "4.4" at 211.5,62.408 h1.52
  text "Dielectric 4" at 149.54,59.36 h1.52
  text "FR-4" at 173.156,59.36 h1.52
  text "0.203mm" at 194.994,59.36 h1.52
  text "4.4" at 211.5,59.36 h1.52
  text "Dielectric 5" at 149.54,56.312 h1.52
  text "PP-006" at 173.156,56.312 h1.52
  text "0.203mm" at 194.994,56.312 h1.52
  text "4.4" at 211.5,56.312 h1.52
  text "4" at 139.129,53.264 h1.52
  text "SIGNAL-2" at 149.54,53.264 h1.52
  text "CF-004" at 173.156,53.264 h1.52
  text "0.030mm" at 194.994,53.264 h1.52
  text "Dielectric 6" at 149.54,50.216 h1.52
  text "PP-006" at 173.156,50.216 h1.52
  text "0.250mm" at 194.994,50.216 h1.52
  text "4.6" at 211.5,50.216 h1.52
  text "5" at 139.129,47.168 h1.52
  text "GND-2" at 149.54,47.168 h1.52
  text "CF-004" at 173.156,47.168 h1.52
  text "0.030mm" at 194.994,47.168 h1.52
  text "Dielectric 7" at 149.54,44.12 h1.52
  text "PP-006" at 173.156,44.12 h1.52
  text "0.203mm" at 194.994,44.12 h1.52
  text "4.4" at 211.5,44.12 h1.52
  text "6" at 139.129,41.072 h1.52
  text "Bottom Layer" at 149.54,41.072 h1.52
  text "0.035mm" at 194.994,41.072 h1.52
  text "Bottom Solder" at 149.54,38.024 h1.52
  text "Solder Resist" at 173.156,38.024 h1.52
  text "0.010mm" at 194.994,38.024 h1.52
  text "3.5" at 211.5,38.024 h1.52
  text "Bottom Overlay" at 149.54,34.976 h1.52
  text "Total board thickness:" at 139.129,31.928 h1.52
  text "1.725mm" at 194.994,31.928 h1.52
Mechanical 13:
  lines w0.127: 95.562,0.001 95.563,0
Drill Drawing:
  drawing of 154 lines, arcs and shapes, not listed
  text "Symbol" at 2.553,151.789 h1.83
  text "Count" at 15.402,151.789 h1.83
  text "Hole Size" at 30.638,151.789 h1.83
  text "Plated" at 59.078,151.789 h1.83
  text "Hole Type" at 71.927,151.789 h1.83
  text "Drill Layer Pair" at 90.565,151.789 h1.83
  text "Via/Pad" at 128.654,151.789 h1.83
  text "Pad Shape" at 143.636,151.789 h1.83
  text "Template" at 162.579,151.789 h1.83
  text "Description" at 231.9,151.789 h1.83
  text "Hole Tolerance (+)" at 253.586,151.789 h1.83
  text "Hole Tolerance (-)" at 287.459,151.789 h1.83
  text "Hole Length" at 321.333,151.789 h1.83
  text "Routed Path Length" at 349.265,151.789 h1.83
  text "1" at 15.402,147.979 h1.52
  text "0.580mm (22.84mil)" at 30.638,147.979 h1.52
  text "NPTH" at 59.078,147.979 h1.52
  text "Slot" at 71.927,147.979 h1.52
  text "Top Layer - Bottom Layer" at 90.565,147.979 h1.52
  text "Pad" at 128.654,147.979 h1.52
  text "Rounded" at 143.636,147.979 h1.52
  text "c0hn58_100" at 162.579,147.979 h1.52
  text "1.000mm (39.37mil)" at 321.333,147.979 h1.52
  text "0.420mm (16.54mil)" at 349.265,147.979 h1.52
  text "1" at 15.402,144.169 h1.52
  text "0.660mm (25.98mil)" at 30.638,144.169 h1.52
  text "NPTH" at 59.078,144.169 h1.52
  text "Round" at 71.927,144.169 h1.52
  text "Top Layer - Bottom Layer" at 90.565,144.169 h1.52
  text "Pad" at 128.654,144.169 h1.52
  text "Rounded" at 143.636,144.169 h1.52
  text "c0hn66" at 162.579,144.169 h1.52
  text "-" at 321.333,144.169 h1.52
  text "-" at 349.265,144.169 h1.52
  text "A" at 1.814,143.915 h1.69
  text "2" at 15.402,140.359 h1.52
  text "1.000mm (39.37mil)" at 30.638,140.359 h1.52
  text "PTH" at 59.078,140.359 h1.52
  text "Slot" at 71.927,140.359 h1.52
  text "Top Layer - Bottom Layer" at 90.565,140.359 h1.52
  text "Pad" at 128.654,140.359 h1.52
  text "Rounded" at 143.636,140.359 h1.52
  text "r150_300h100_240r100m155_305mx155_305p150_300" at 162.579,140.359 h1.52
  text "2.400mm (94.49mil)" at 321.333,140.359 h1.52
  text "1.400mm (55.12mil)" at 349.265,140.359 h1.52
  text "3" at 15.402,136.549 h1.52
  text "1.000mm (39.37mil)" at 30.638,136.549 h1.52
  text "PTH" at 59.078,136.549 h1.52
  text "Round" at 71.927,136.549 h1.52
  text "Top Layer - Bottom Layer" at 90.565,136.549 h1.52
  text "Pad" at 128.654,136.549 h1.52
  text "Rounded" at 143.636,136.549 h1.52
  text "c152h100m157mx157p152" at 162.579,136.549 h1.52
  text "-" at 321.333,136.549 h1.52
  text "-" at 349.265,136.549 h1.52
  text "4" at 15.402,132.739 h1.52
  text "0.700mm (27.56mil)" at 30.638,132.739 h1.52
  text "PTH" at 59.078,132.739 h1.52
  text "Round" at 71.927,132.739 h1.52
  text "Top Layer - Bottom Layer" at 90.565,132.739 h1.52
  text "Pad" at 128.654,132.739 h1.52
  text "Rounded" at 143.636,132.739 h1.52
  text "c100h70" at 162.579,132.739 h1.52
  text "-" at 321.333,132.739 h1.52
  text "-" at 349.265,132.739 h1.52
  text "4" at 15.402,128.929 h1.52
  text "0.750mm (29.53mil)" at 30.638,128.929 h1.52
  text "NPTH" at 59.078,128.929 h1.52
  text "Round" at 71.927,128.929 h1.52
  text "Top Layer - Bottom Layer" at 90.565,128.929 h1.52
  text "Pad" at 128.654,128.929 h1.52
  text "Rectangle" at 143.636,128.929 h1.52
  text "s0hn75" at 162.579,128.929 h1.52
  text "-" at 321.333,128.929 h1.52
  text "-" at 349.265,128.929 h1.52
  text "4" at 15.402,125.119 h1.52
  text "3.000mm (118.11mil)" at 30.638,125.119 h1.52
  text "NPTH" at 59.078,125.119 h1.52
  text "Round" at 71.927,125.119 h1.52
  text "Top Layer - Bottom Layer" at 90.565,125.119 h1.52
  text "Pad" at 128.654,125.119 h1.52
  text "Rounded" at 143.636,125.119 h1.52
  text "c0hn300" at 162.579,125.119 h1.52
  text "-" at 321.333,125.119 h1.52
  text "-" at 349.265,125.119 h1.52
  text "6" at 15.402,121.309 h1.52
  text "0.914mm (36.00mil)" at 30.638,121.309 h1.52
  text "PTH" at 59.078,121.309 h1.52
  text "Round" at 71.927,121.309 h1.52
  text "Top Layer - Bottom Layer" at 90.565,121.309 h1.52
  text "Pad" at 128.654,121.309 h1.52
  text "(Mixed)" at 143.636,121.309 h1.52
  text "(Mixed)" at 162.579,121.309 h1.52
  text "-" at 321.333,121.309 h1.52
  text "-" at 349.265,121.309 h1.52
  text "24" at 15.402,117.499 h1.52
  text "0.900mm (35.43mil)" at 30.638,117.499 h1.52
  text "PTH" at 59.078,117.499 h1.52
  text "Round" at 71.927,117.499 h1.52
  text "Top Layer - Bottom Layer" at 90.565,117.499 h1.52
  text "Pad" at 128.654,117.499 h1.52
  text "Rounded" at 143.636,117.499 h1.52
  text "(Mixed)" at 162.579,117.499 h1.52
  text "-" at 321.333,117.499 h1.52
  text "-" at 349.265,117.499 h1.52
  text "30" at 15.402,113.689 h1.52
  text "1.600mm (62.99mil)" at 30.638,113.689 h1.52
  text "PTH" at 59.078,113.689 h1.52
  text "Round" at 71.927,113.689 h1.52
  text "Top Layer - Bottom Layer" at 90.565,113.689 h1.52
  text "Pad" at 128.654,113.689 h1.52
  text "(Mixed)" at 143.636,113.689 h1.52
  text "(Mixed)" at 162.579,113.689 h1.52
  text "-" at 321.333,113.689 h1.52
  text "-" at 349.265,113.689 h1.52
  text "611" at 15.402,109.879 h1.52
  text "0.300mm (11.81mil)" at 30.638,109.879 h1.52
  text "PTH" at 59.078,109.879 h1.52
  text "Round" at 71.927,109.879 h1.52
  text "Top Layer - Bottom Layer" at 90.565,109.879 h1.52
  text "(Mixed)" at 128.654,109.879 h1.52
  text "Rounded" at 143.636,109.879 h1.52
  text "(Mixed)" at 162.579,109.879 h1.52
  text "-" at 321.333,109.879 h1.52
  text "-" at 349.265,109.879 h1.52
  text "690 Total" at 15.402,106.069 h1.52
  text "Slot definitions :" at 2.553,102.387 h1.52
  text "Routed Path Length" at 28.783,102.387 h1.52
  text "= Calculated from tool start centre position to tool end centre position." at 56.791,102.387 h1.52
  text "Hole Length" at 28.783,99.847 h1.52
  text "= Routed Path Length + Tool Size = Slot length as defined in the PCB layout" at 46.38,99.847 h1.52

## Text inside footprints (layer, text, board x,y; h text height)
J3: Top Overlay "A1" at 4.008,50.278 h0.5 r270; Top Overlay "B1" at 2.306,43.242 h0.5 r270
J14: Top Overlay "1" at 93.148,13.041 h1 r180; Mechanical 13 "Board Cutout" at 94.194,4.778 h1 r180
J15: Bottom Overlay "Board Edge" at 118.88,46.366 h0.76 r90
J16: Bottom Overlay "Board Edge" at 118.88,32.24 h0.76 r90
J18: Bottom Overlay "1" at 35.611,52.883 h0.76; Bottom Overlay "PCB Edge" at 41.501,50.295 h0.8 r90